# Altium PCB OmniCore_SDR.PcbDoc (part 5 of 14)
Units mil, origin at the board's own origin, x right, y up, seen from the top; angles counter-clockwise.
Board outline 4724.72 x 2755.91 mil, 8 copper layers (Top, GND 1, Layer 1, Layer 2, GND 2, Layer 3, Power, Bottom), stack 40.468 mil thick; 534 components, 427 nets, 2325 pads, 1892 vias.
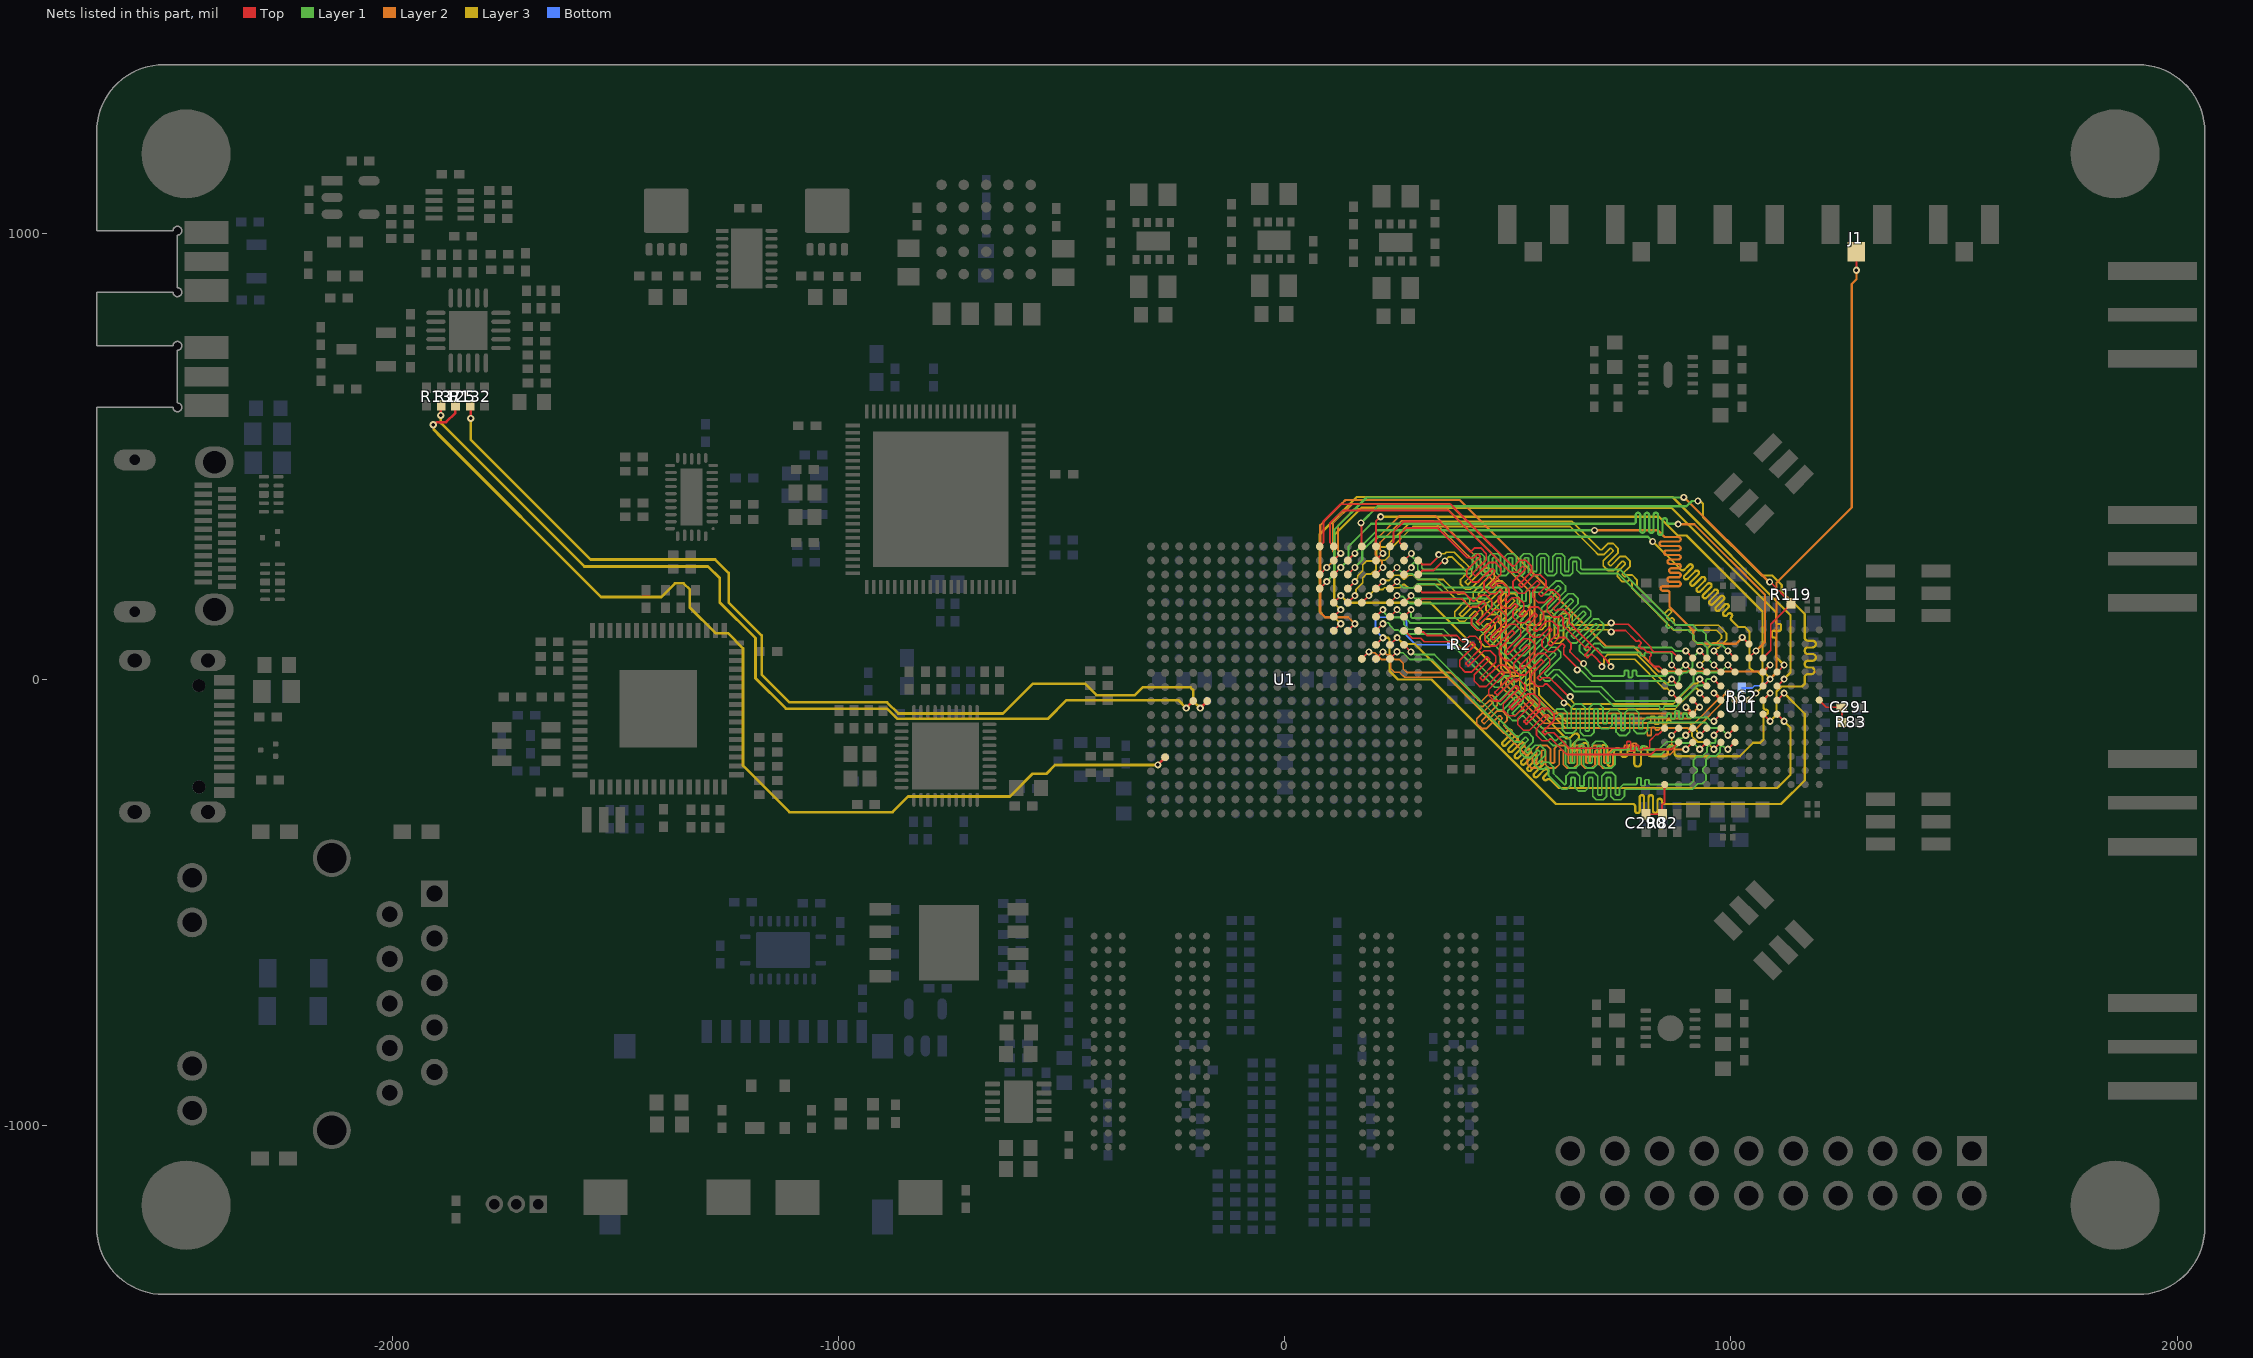
[diagram p10: the nets of this part, all layers, seen from the top]

## Via types
v1: diameter 16, hole 8, Top to Bottom, tented both sides, 1844 vias
v2: diameter 19.68, hole 7.87, Top to Bottom, 44 vias
v3: diameter 200, hole 125, Top to Bottom, 4 vias

## Nets (pads, with @x,y where several pads share a name; then routed paths per layer and width w, separated by ;. In a path a pad name is that pad's centre, name@x,y a point inside that pad or via, vN(x,y) a via of type N, cw(c..) or ccw(c..) an arc to the next point about the centre after c; other vN are vias at no path point) (continued)
AD9361_CTRL_OUT5: U1.T20 U11.F5 | length 1626.3
  Top w4.2: v1(171,351) 172.49,349.51 172.49,298.92 U1.T20@172.98,298.43 ; U11.F5@1071.98,-77.54 v1(1087.73,-93.28)
  Layer 1 w5: v1(171,351) 208.3,388.3 900.7,388.3 912.6,400.2 v1(925.9,400.2)
  Layer 3 w5: v1(925.9,400.2) 928,398.1 933.83,398.1 937.7,394.22 937.7,364.3 1068.9,233.1 1080.59,233.1 1080.69,233.2 1092.71,233.2 1114.1,211.81 1114.1,198 1165.22,146.88 1165.22,97.2 1165.22,94.7 ccw(c1172.72,94.7) 1172.72,87.2 1182.72,87.2 cw(c1182.72,79.7) 1182.72,72.2 1172.72,72.2 ccw(c1172.72,64.7) 1172.72,57.2 1182.72,57.2 cw(c1182.72,49.7) 1182.72,42.2 1172.72,42.2 ccw(c1172.72,34.7) 1172.72,27.2 1180.09,27.2 cw(c1180.09,19.7) 1180.09,12.2 1172.72,12.2 ccw(c1172.72,4.7) 1165.22,4.7 1165.22,-9.98 1159.52,-15.68 1113.33,-15.68 1102.23,-26.78 1102.23,-78.78 v1(1087.73,-93.28)
AD9361_CTRL_OUT6: U1.V13 U11.F4 | length 1625.5
  Top w4.2: U1.V13@235.98,77.95 v1(252,94) ; U11.F4@1103.48,-77.54 v1(1119.23,-93.28)
  Layer 3 w5: v1(252,94) 266.5,79.5 291.5,79.5 487.3,-116.3 489.07,-118.07 ccw(c492.6,-114.53) 496.14,-118.07 500.5,-113.7 cw(c504.04,-117.24) 507.58,-113.7 cw(c504.04,-117.24) 507.58,-120.77 488.57,-139.78 ccw(c492.11,-143.31) 488.57,-146.85 ccw(c492.11,-143.31) 495.65,-146.85 514.65,-127.85 cw(c518.18,-131.38) 521.72,-127.85 cw(c518.18,-131.38) 521.72,-134.92 502.72,-153.92 ccw(c506.25,-157.45) 502.72,-160.99 ccw(c506.25,-157.45) 509.79,-160.99 528.79,-141.99 cw(c532.32,-145.52) 535.86,-141.99 cw(c532.32,-145.52) 535.86,-149.06 516.86,-168.06 ccw(c520.39,-171.59) 516.86,-175.13 ccw(c520.39,-171.59) 523.93,-175.13 542.93,-156.13 cw(c546.47,-159.66) 550,-156.13 cw(c546.47,-159.66) 550,-163.2 531,-182.2 ccw(c534.54,-185.74) 531,-189.27 ccw(c534.54,-185.74) 538.07,-189.27 557.07,-170.27 cw(c560.61,-173.81) 564.14,-170.27 cw(c560.61,-173.81) 564.14,-177.34 545.14,-196.34 ccw(c548.68,-199.88) 545.14,-203.41 ccw(c548.68,-199.88) 552.21,-203.41 571.21,-184.41 cw(c574.75,-187.95) 578.29,-184.41 cw(c574.75,-187.95) 578.29,-191.48 559.28,-210.49 ccw(c562.82,-214.02) 559.28,-217.56 ccw(c562.82,-214.02) 566.36,-217.56 581.91,-202 cw(c585.44,-205.54) 588.98,-202 cw(c585.44,-205.54) 588.98,-209.08 580.99,-217.06 ccw(c584.53,-220.6) 580.99,-224.13 ccw(c584.53,-220.6) 588.06,-224.13 cw(c591.6,-227.67) 595.13,-224.13 612.43,-241.43 614.2,-243.2 1104,-243.2 1133.73,-213.47 1133.73,-107.78 v1(1119.23,-93.28)
AD9361_CTRL_OUT7: R2.2 U1.U13 U11.G4 | length 1882.2
  Top w4.2: U1.U13@204.48,77.95 v1(220.23,93.7) ; U11.G4@1103.48,-46.04 v1(1119.23,-30.29)
  Layer 3 w5: v1(220.23,93.7) 220.31,93.62 232.07,93.62 235,90.69 235,19 254,0 329,0 608,-279 768,-279 780.5,-279 cw(c780.5,-284) 785.5,-284 785.5,-294 ccw(c790.5,-294) 795.5,-294 795.5,-264 cw(c800.5,-264) 805.5,-264 805.5,-294 ccw(c810.5,-294) 815.5,-294 815.5,-264 cw(c820.5,-264) 825.5,-264 825.5,-294 ccw(c830.5,-294) 835.5,-294 835.5,-272.06 cw(c840.5,-272.06) 845.5,-272.06 845.5,-274 ccw(c850.5,-274) 850.5,-279 883.7,-279 1112.4,-279 1165.22,-226.18 1165.22,-76.29 v1(1119.23,-30.29)
  Bottom w4.2: v1(220.23,93.7) 203.9,110.03 203.9,133.2 210.4,139.7 265.6,139.7 272.7,132.6 272.7,99 293.7,78 R2.2@375.31,78
AD9361_DATA_CLK_N: U1.P20 U11.H11 | length 1285.1
  Top w4: U1.P20@109.99,298.43 109.99,298.63 101.24,307.38 101.24,350.24 130,379 366.54,379 433.27,312.27 496.52,249.02 504.94,240.61 519.85,240.61 532.65,253.41 534.56,253.41 539.02,248.96 539.02,247.05 511.37,219.4 511.37,205.89 524.02,193.24 537.53,193.24 565.18,220.88 567.09,220.88 571.54,216.43 571.54,214.52 555.94,198.92 555.94,185.41 568.6,172.76 582.1,172.76 595.91,186.57 597.82,186.57 602.28,182.11 602.28,180.2 588.47,166.39 588.47,152.89 601.12,140.23 614.63,140.23 617.43,143.03 619.34,143.03 623.79,138.57 623.79,136.66 623.79,121.75 642.77,102.77 671.94,73.61 673.35,72.19 676.67,72.19 678.3,73.82 680.21,73.82 684.66,69.37 684.66,67.46 673.31,56.11 673.31,54.2 677.77,49.75 679.68,49.75 686.08,56.15 689.39,56.15 695.77,49.77 708.7,36.84 708.7,31.3 v1(711,29) ; v1(867.26,1.2) U11.H11@883.01,-14.54
  Layer 3 w4: v1(711,29) 711,32.25 715.5,36.75 715.5,47.56 724.29,56.34 789.01,56.34 854.4,-9.04 857.71,-9.04 867.26,0.5 v1(867.26,1.2)
AD9361_DATA_CLK_P: U1.N20 U11.G11 | length 1284.1
  Top w4: U1.N20@78.5,298.43 78.5,298.63 87.24,307.38 87.24,356.04 124.2,393 372.34,393 443.17,322.17 506.42,258.92 510.74,254.61 514.05,254.61 526.85,267.41 540.36,267.41 553.02,254.75 553.02,241.25 525.37,213.6 525.37,211.69 529.82,207.24 531.73,207.24 559.38,234.88 572.89,234.88 585.54,222.23 585.54,208.72 569.94,193.12 569.94,191.21 574.4,186.76 576.31,186.76 590.11,200.57 603.62,200.57 616.28,187.91 616.28,174.4 602.47,160.59 602.47,158.69 606.92,154.23 608.83,154.23 611.63,157.03 625.14,157.03 637.79,144.37 637.79,130.87 637.79,127.55 652.67,112.67 723.05,42.3 723.05,40.2 731,32.25 v1(731,29) ; v1(867.26,-30.29) U11.G11@883.01,-46.04
  Layer 3 w4: v1(731,29) 731,32.25 726.5,36.75 726.5,43 728.84,45.34 784.46,45.34 849.84,-20.04 857.71,-20.04 867.26,-29.59 v1(867.26,-30.29)
AD9361_EN_AGC: U1.P16 U11.G5 | length 1626.8
  Top w4.2: U1.P16@109.99,172.44 v1(125.74,188.19) ; U11.G5@1071.98,-46.04 v1(1087.73,-30.29)
  Layer 3 w5: v1(125.74,188.19) 141.93,172 327,172 606.1,-107.1 607.87,-108.87 629.08,-130.08 ccw(c634.38,-124.78) 639.69,-130.08 646.76,-123.01 cw(c652.06,-128.31) 657.37,-123.01 cw(c652.06,-128.31) 657.37,-133.62 644.16,-146.82 ccw(c649.46,-152.13) 644.16,-157.43 ccw(c649.46,-152.13) 654.76,-157.43 667.97,-144.22 cw(c673.28,-149.53) 678.58,-144.22 cw(c673.28,-149.53) 678.58,-154.83 674.61,-158.8 ccw(c679.92,-164.1) 679.92,-171.6 698.3,-171.6 700.8,-171.6 ccw(c700.8,-164.1) 708.3,-164.1 708.3,-154.1 cw(c715.8,-154.1) 723.3,-154.1 723.3,-187.5 ccw(c730.8,-187.5) 738.3,-187.5 738.3,-161 cw(c745.8,-161) 753.3,-161 753.3,-166 ccw(c760.8,-166) 768.3,-166 768.3,-154.1 cw(c775.8,-154.1) 783.3,-154.1 783.3,-187.5 ccw(c790.8,-187.5) 798.3,-187.5 798.3,-157 cw(c805.8,-157) 813.3,-157 813.3,-164.1 ccw(c820.8,-164.1) 820.8,-171.6 850.8,-171.6 ccw(c850.8,-164.1) 858.3,-164.1 858.3,-154.1 cw(c865.8,-154.1) 873.3,-154.1 873.3,-164.1 ccw(c880.8,-164.1) 880.8,-171.6 901.7,-171.6 1020,-171.6 1049.82,-141.78 1066.46,-141.78 1073.23,-135 1073.23,-82.5 cw(c1078.23,-82.5) 1078.23,-77.5 ccw(c1078.23,-72.5) 1078.23,-67.5 cw(c1078.23,-62.5) 1073.23,-62.5 1073.23,-44.79 1083.09,-34.94 v1(1087.73,-30.29)
AD9361_ENABLE: U1.R18 U11.G6 | length 1625.5
  Top w4.2: U1.R18@141.49,235.43 v1(157.24,251.18) ; U11.G6@1040.49,-46.04 v1(1056.24,-30.29)
  Layer 1 w5: v1(157.24,251.18) 174,267.94 174,288.45 205.55,320 813.98,320 v1(824.48,309.5)
  Layer 3 w5: v1(824.48,309.5) 825,309.5 886.4,248.1 888.17,246.33 ccw(c891.7,249.87) 895.24,246.33 905.85,256.94 cw(c909.38,253.4) 912.92,256.94 cw(c909.38,253.4) 912.92,249.87 896.02,232.97 ccw(c899.56,229.44) 896.02,225.9 ccw(c899.56,229.44) 903.1,225.9 919.99,242.8 cw(c923.52,239.26) 927.06,242.8 cw(c923.52,239.26) 927.06,235.73 910.17,218.83 ccw(c913.7,215.3) 910.17,211.76 ccw(c913.7,215.3) 917.24,211.76 934.13,228.65 cw(c937.67,225.12) 941.2,228.65 cw(c937.67,225.12) 941.2,221.58 924.31,204.69 ccw(c927.84,201.15) 924.31,197.62 ccw(c927.84,201.15) 931.38,197.62 948.27,214.51 cw(c951.81,210.98) 955.34,214.51 cw(c951.81,210.98) 955.34,207.44 938.45,190.55 ccw(c941.99,187.01) 938.45,183.48 ccw(c941.99,187.01) 945.52,183.48 962.41,200.37 cw(c965.95,196.83) 969.49,200.37 cw(c965.95,196.83) 969.49,193.3 952.59,176.41 ccw(c956.13,172.87) 952.59,169.34 ccw(c956.13,172.87) 959.66,169.34 976.56,186.23 cw(c980.09,182.69) 983.63,186.23 cw(c980.09,182.69) 983.63,179.16 966.73,162.26 ccw(c970.27,158.73) 966.73,155.19 ccw(c970.27,158.73) 973.81,155.19 986.66,168.05 cw(c990.2,164.51) 993.73,168.05 cw(c990.2,164.51) 993.73,160.98 983.63,150.87 ccw(c987.16,147.34) 983.63,143.8 ccw(c987.16,147.34) 990.7,143.8 994.23,147.34 cw(c997.77,143.8) 1001.31,147.34 cw(c997.77,143.8) 1001.31,140.27 ccw(c1004.84,136.73) 1001.31,133.19 1011.58,122.92 1013.35,121.15 1016.4,118.1 1031.1,118.1 1041.74,107.46 1041.74,26.69 1050.42,18.01 1059.94,18.01 1070.74,7.21 1070.74,-15.79 v1(1056.24,-30.29)
AD9361_FB_CLK_N: U1.P19 U11.G10 | length 1320.6
  Top w4: U11.G10@914.5,-46.04 914.5,-46.27 930,-61.77 v1(930,-62)
  Top w4.2: U1.P19@109.99,266.93 v1(125.74,282.68)
  Layer 2 w4: v1(125.74,282.68) 125.74,284.52 119.24,291.02 119.24,345.24 157,383 364.44,383 549.1,198.34 549.1,-39.1 559,-49 566.78,-56.78 566.78,-60.09 562.11,-64.76 562.11,-66.67 566.56,-71.13 568.47,-71.13 575.97,-63.63 577.88,-63.63 582.33,-68.09 582.33,-70 576.31,-76.02 576.31,-77.93 580.76,-82.38 582.67,-82.38 585.87,-79.18 589.18,-79.18 597,-87 909.36,-87 920,-76.36 920,-68.49 922.34,-66.14 922.61,-66.14 926.75,-62 v1(930,-62)
AD9361_FB_CLK_P: U1.N18 U11.F10 | length 1320.5
  Top w4: v1(899,-62) U11.F10@914.5,-77.54
  Top w4.2: U1.N18@78.5,235.43 v1(94.24,251.18)
  Layer 2 w4: v1(94.24,251.18) 109.81,266.75 109.81,284.9 108.24,286.46 108.24,349.8 152.44,394 369,394 560.1,202.9 560.1,193.79 560.1,-34.54 566.78,-41.22 601.56,-76 904.8,-76 909,-71.8 909,-68.49 906.66,-66.14 906.39,-66.14 902.25,-62 v1(899,-62)
AD9361_RESET: R119.1 U1.N17 U11.K5 | length 1446.6
  Top w4.2: U1.N17@78.5,203.94 v1(94.24,219.68) ; U11.K5@1071.98,48.45 1089.31,65.77 1089.31,123.66 1134.4,168.75 1134.4,172.68 1088.38,218.7 v1(1086.7,218.7)
  Layer 1 w5: v1(94.24,219.68) 111,236.44 111,336 183.3,408.3 v1(894.2,408.3)
  Layer 2 w5: v1(894.2,408.3) 895.65,408.3 1085.25,218.7 v1(1086.7,218.7)
AD9361_RX_D0_N: U1.Y19 U11.K11 | length 1266.4
  Top w4: U1.Y19@298.97,266.93 299.17,266.93 307.92,258.18 327.42,258.18 341.22,271.98 ; 740.34,124 769.54,124 821.64,71.9 821.64,67.92 827.04,62.52 868.94,62.52 U11.K11@883.01,48.45
  Layer 3 w4: v1(345,280) 347.11,282.11 359,282.11 362.41,285.52 380.04,285.52 383.26,282.3 398.28,267.28 401.97,263.59 419.33,246.22 419.33,233.8 405.29,219.75 405.29,217.84 409.74,213.39 411.65,213.39 447.61,249.35 458.64,249.35 469.53,238.45 469.53,227.43 433.57,191.47 433.57,189.56 438.03,185.1 439.94,185.1 475.9,221.06 486.92,221.06 497.82,210.16 497.82,199.14 461.86,163.18 461.86,161.27 466.31,156.82 468.22,156.82 504.18,192.78 515.2,192.78 526.1,181.88 526.1,170.86 490.14,134.9 490.14,132.99 494.6,128.53 496.51,128.53 532.47,164.49 543.49,164.49 554.39,153.6 554.39,142.57 540.34,128.53 540.34,125.21 542.59,122.97 543.06,122.5 549.5,122.5 566,122.5 571.22,122.5 573.57,124.84 573.57,144.71 581.36,152.5 596.77,152.5 604.57,144.71 604.57,93.85 605.92,92.5 612.22,92.5 613.57,93.85 613.57,140.6 621.36,148.39 636.77,148.39 644.57,140.6 644.57,124.84 646.91,122.5 662.95,122.5 724.25,122.5 728.75,127 v1(732,127)
AD9361_RX_D0_P: U1.Y18 U11.J12 | length 1266.7
  Top w4: U1.Y18@298.97,235.43 299.17,235.43 307.92,244.18 333.22,244.18 351.12,262.08 ; 740.34,110 763.74,110 786.37,87.37 787.78,85.95 791.1,85.95 792.48,87.34 794.39,87.34 798.84,82.88 798.84,80.97 794.15,76.28 794.15,74.37 798.6,69.91 800.51,69.91 803.83,69.91 807.37,66.37 811.74,62 816.25,62 821.07,57.18 821.07,53.87 818,50.8 818,39.2 827.96,29.24 839.23,29.24 U11.J12@851.51,16.95
  Layer 3 w4: v1(359.14,265.86) 359.14,266.69 366.97,274.52 375.48,274.52 390.5,259.5 394.19,255.81 408.33,241.66 408.33,238.35 394.29,224.31 394.29,213.28 405.19,202.39 416.21,202.39 452.17,238.35 454.08,238.35 458.53,233.89 458.53,231.98 422.57,196.02 422.57,185 433.47,174.1 444.49,174.1 480.45,210.06 482.36,210.06 486.82,205.61 486.82,203.7 450.86,167.74 450.86,156.72 461.76,145.82 472.78,145.82 508.74,181.78 510.65,181.78 515.1,177.32 515.1,175.41 479.14,139.45 479.14,128.43 490.04,117.53 501.06,117.53 537.02,153.49 538.93,153.49 543.39,149.04 543.39,147.13 529.34,133.08 529.34,120.66 534.81,115.19 538.5,111.5 566,111.5 575.78,111.5 584.57,120.29 584.57,140.15 585.92,141.5 592.22,141.5 593.57,140.15 593.57,89.29 601.36,81.5 616.77,81.5 624.57,89.29 624.57,136.04 625.92,137.39 632.22,137.39 633.57,136.04 633.57,120.29 642.35,111.5 662.95,111.5 724.25,111.5 728.75,107 v1(732,107)
AD9361_RX_D1_N: U1.V18 U11.K10 | length 1328.2
  Top w4: U1.V18@235.98,235.43 v1(251.72,251.18) ; v1(898.76,64.2) U11.K10@914.5,48.45
  Layer 1 w4: v1(251.72,251.18) 265.96,236.94 285.76,236.94 297.7,225 341.06,225 359.48,206.58 474,206.58 523.25,206.58 532.03,197.79 532.03,177.1 533.38,175.75 539.68,175.75 541.03,177.1 541.03,197.79 549.82,206.58 559.6,206.58 580.72,206.58 581.68,205.62 585.37,201.93 588.68,201.93 607.4,220.65 618.42,220.65 629.32,209.75 629.32,198.73 586.29,155.7 586.29,153.79 590.74,149.34 592.65,149.34 635.69,192.37 646.71,192.37 657.61,181.47 657.61,170.45 614.57,127.42 614.57,125.51 619.03,121.05 620.94,121.05 663.97,164.08 674.99,164.08 685.89,153.19 685.89,142.16 642.86,99.13 642.86,97.22 647.31,92.77 649.22,92.77 692.25,135.8 703.28,135.8 714.17,124.9 714.17,113.88 671.59,71.29 671.59,69.38 676.04,64.93 677.95,64.93 693.95,80.92 706.38,80.92 714.36,72.94 715.3,72 720.8,72 867.23,72 875.04,64.2 v1(898.76,64.2)
AD9361_RX_D1_P: U1.V17 U11.J11 | length 1328.2
  Top w4: U1.V17@235.98,203.94 v1(251.72,219.68) ; v1(867.26,32.7) U11.J11@883.01,16.95
  Layer 1 w4: v1(251.72,219.68) 265.72,205.68 289.02,205.68 297.33,214 336.5,214 354.92,195.58 474,195.58 518.69,195.58 521.03,193.24 521.03,172.54 528.83,164.75 544.24,164.75 552.03,172.54 552.03,193.24 554.38,195.58 559.6,195.58 571.63,195.58 576.17,195.58 577.59,194.15 580.81,190.93 593.24,190.93 611.96,209.65 613.87,209.65 618.32,205.2 618.32,203.29 575.29,160.26 575.29,149.23 586.19,138.34 597.21,138.34 640.24,181.37 642.15,181.37 646.61,176.91 646.61,175 603.57,131.97 603.57,120.95 614.47,110.05 625.49,110.05 668.53,153.08 670.44,153.08 674.89,148.63 674.89,146.72 631.86,103.69 631.86,92.67 642.76,81.77 653.78,81.77 696.81,124.8 698.72,124.8 703.17,120.34 703.17,118.44 660.59,75.85 660.59,64.83 671.49,53.93 682.51,53.93 698.51,69.92 701.82,69.92 706.58,65.16 710.27,61.47 710.74,61 784.3,61 795.3,61 797.64,58.66 797.64,54.83 798.99,53.48 805.29,53.48 806.64,54.83 806.64,58.66 808.99,61 831,61 862.68,61 867.26,56.42 v1(867.26,32.7)
AD9361_RX_D2_N: U1.W20 U11.K9 | length 1329.9
  Top w4: U1.W20@267.47,298.43 266.14,298.43 257.85,306.72 257.85,325.2 272.65,340 341.96,340 350.98,330.98 400.31,281.65 408.72,273.24 423.63,273.24 431.46,281.06 433.37,281.06 437.82,276.61 437.82,274.7 408.08,244.96 408.08,231.45 420.74,218.79 434.25,218.79 463.99,248.53 465.9,248.53 470.35,244.08 470.35,242.17 446.59,218.41 446.59,204.9 459.25,192.25 472.76,192.25 482.44,201.93 484.35,201.93 488.8,197.48 488.8,195.57 479.12,185.89 479.12,172.38 491.78,159.72 505.28,159.72 515.18,169.62 517.09,169.62 521.55,165.17 521.55,163.26 511.65,153.36 511.65,139.85 524.3,127.2 537.81,127.2 559.54,148.92 561.45,148.92 565.9,144.47 565.9,142.56 544.17,120.83 544.17,107.32 556.83,94.67 570.34,94.67 592.28,116.62 594.19,116.62 598.65,112.16 598.65,110.25 576.7,88.3 576.7,74.8 589.36,62.14 602.86,62.14 621.04,80.32 622.95,80.32 627.4,75.86 627.4,73.95 625.16,71.71 625.16,56.8 634.48,47.48 652.08,29.88 652.08,28.76 655.8,25.04 v1(655.8,21.79) ; v1(930.25,64.2) U11.K9@946,48.45
  Layer 1 w4: v1(655.8,21.79) 658.03,19.56 664.52,19.56 687.16,-3.08 851.75,-3.08 861.46,-12.8 873.06,-12.8 884.76,-1.1 884.76,7 892.96,15.2 901.06,15.2 913.7,27.84 913.7,47.64 v1(930.25,64.2)
AD9361_RX_D2_P: U1.V20 U11.J10 | length 1329.9
  Top w4: U1.V20@235.98,298.43 235.98,299.75 243.85,307.63 243.85,331 266.85,354 347.76,354 360.88,340.88 410.21,291.55 414.52,287.24 417.84,287.24 425.66,295.06 439.17,295.06 451.82,282.41 451.82,268.9 422.08,239.16 422.08,237.25 426.54,232.79 428.45,232.79 458.19,262.53 471.7,262.53 484.35,249.88 484.35,236.37 460.59,212.61 460.59,210.7 465.05,206.25 466.96,206.25 476.64,215.93 490.15,215.93 502.8,203.27 502.8,189.77 493.12,180.09 493.12,178.18 497.57,173.72 499.48,173.72 509.38,183.62 522.89,183.62 535.55,170.97 535.55,157.46 525.65,147.56 525.65,145.65 530.1,141.2 532.01,141.2 553.74,162.92 567.25,162.92 579.9,150.27 579.9,136.76 558.17,115.03 558.17,113.12 562.63,108.67 564.54,108.67 586.48,130.62 599.99,130.62 612.65,117.96 612.65,104.45 590.7,82.51 590.7,80.6 595.15,76.14 597.06,76.14 615.24,94.32 628.74,94.32 641.4,81.66 641.4,68.15 639.16,65.91 639.16,62.6 644.38,57.38 661.98,39.78 662.97,39.78 666.75,36 v1(669.87,36) ; v1(898.76,32.7) U11.J10@914.5,16.95
  Layer 1 w4: v1(669.87,36) 672.17,33.7 672.17,27.47 691.72,7.92 757,7.92 759,7.92 761.34,10.26 761.34,19.19 762.69,20.54 768.99,20.54 770.34,19.19 770.34,6.27 771.69,4.92 777.99,4.92 779.34,6.27 779.34,18.8 780.69,20.15 786.99,20.15 788.34,18.8 788.34,10.26 790.69,7.92 818,7.92 853.26,7.92 860.55,15.2 873.06,15.2 874.54,13.73 877.85,13.73 890.33,26.2 890.41,26.2 896.91,32.7 v1(898.76,32.7)
AD9361_RX_D3_N: U1.R17 U11.K8 | length 1283.4
  Top w4: U1.R17@141.49,203.94 v1(157.24,219.68) ; v1(961.75,64.2) U11.K8@977.5,48.45
  Layer 3 w4: v1(157.24,219.68) 157.24,221.53 163.73,228.03 163.73,232.73 174.73,243.73 174.73,256.98 183.75,266 197,266 205.82,274.82 205.82,288.06 214.63,296.88 225.82,296.88 282.94,354 644.56,354 703.78,294.78 707.47,291.09 710.78,291.09 724.83,305.13 735.85,305.13 746.75,294.23 746.75,283.21 725.01,261.47 725.01,259.56 729.47,255.11 731.38,255.11 752.24,275.97 763.26,275.97 774.16,265.07 774.16,254.05 757.05,236.95 757.05,235.04 761.51,230.58 763.42,230.58 767.35,234.52 778.37,234.52 789.27,223.62 789.27,212.6 789.27,209.28 803.78,194.78 807.47,191.08 847.78,150.78 849.19,149.36 852.51,149.36 860.5,157.36 862.41,157.36 866.87,152.9 866.87,150.99 856.05,140.18 856.05,138.27 860.5,133.81 862.41,133.81 866.83,138.23 868.74,138.23 873.19,133.77 873.19,131.87 871.6,130.27 871.6,126.96 875.36,123.19 876.78,121.78 972.22,121.78 986.78,107.22 990,104 990,88.59 972.1,70.69 970.09,70.69 963.6,64.2 v1(961.75,64.2)
AD9361_RX_D3_P: U1.R16 U11.J9 | length 1283.4
  Top w4: U1.R16@141.49,172.44 v1(157.28,188.23) ; v1(930.25,32.7) U11.J9@946,16.95
  Layer 3 w4: v1(157.28,188.23) 159.53,190.48 159.53,201.73 174.73,216.93 174.73,228.18 183.34,236.78 194.13,236.78 204.78,247.43 204.78,258.22 214.11,267.55 224.9,267.55 234.23,276.88 234.23,289.73 287.5,343 640,343 696,287 699.69,283.31 702.91,280.09 715.34,280.09 729.39,294.13 731.3,294.13 735.75,289.68 735.75,287.77 714.01,266.03 714.01,255.01 724.91,244.11 735.93,244.11 756.79,264.97 758.7,264.97 763.16,260.51 763.16,258.6 746.05,241.5 746.05,230.48 756.95,219.58 767.97,219.58 771.91,223.52 773.82,223.52 778.27,219.06 778.27,217.15 778.27,204.73 796,187 799.69,183.31 872.22,110.78 967.67,110.78 979,99.44 979,93.15 967.55,81.69 959.45,81.69 946.81,69.06 946.81,49.26 v1(930.25,32.7)
AD9361_RX_D4_N: U1.W19 U11.K7 | length 1329
  Top w4: U1.W19@267.47,266.93 267.95,266.93 283.52,282.5 v1(284,282.5) ; v1(993.24,64.2) U11.K7@1008.99,48.45
  Layer 1 w4: v1(284,282.5) 286.3,280.2 286.3,274.19 289.24,271.25 296.28,271.25 307,260.53 307,250.2 310.2,247 413.74,247 418.37,247 420.72,249.34 420.72,275.38 427.34,282 441.09,282 447.72,275.38 447.72,243.35 449.07,242 455.37,242 456.72,243.35 456.72,275.38 463.34,282 477.09,282 483.72,275.38 483.72,243.35 485.07,242 491.37,242 492.72,243.35 492.72,275.38 499.34,282 513.09,282 519.72,275.38 519.72,243.19 521.07,241.84 527.37,241.84 528.72,243.19 528.72,275.38 535.34,282 549.09,282 555.72,275.38 555.72,243.34 557.07,241.99 563.37,241.99 564.72,243.34 564.72,275.38 571.34,282 585.09,282 591.72,275.38 591.72,243.35 593.07,242 599.37,242 600.72,243.35 600.72,275.38 607.34,282 621.09,282 627.72,275.38 627.72,243.35 629.07,242 635.37,242 636.72,243.35 636.72,267.19 643.34,273.81 657.09,273.81 663.72,267.19 663.72,249.34 666.06,247 748.58,247 750.44,247 874.99,122.46 914.45,122.46 927.21,109.69 936.05,109.69 944.25,101.49 944.25,89.47 955.53,78.2 979.24,78.2 v1(993.24,64.2)
AD9361_RX_D4_P: U1.W18 U11.J8 | length 1329
  Top w4: U1.W18@267.47,235.43 267.95,235.43 283.52,251 v1(284,251) ; v1(961.75,32.7) U11.J8@977.5,16.95
  Layer 1 w4: v1(284,251) 286.3,253.3 286.3,259.31 289.24,262.25 292.55,262.25 298,256.8 298,246.47 306.47,238 413.74,238 422.1,238 429.72,245.62 429.72,271.65 431.07,273 437.37,273 438.72,271.65 438.72,239.62 445.34,233 459.09,233 465.72,239.62 465.72,271.65 467.07,273 473.37,273 474.72,271.65 474.72,239.62 481.34,233 495.09,233 501.72,239.62 501.72,271.65 503.07,273 509.37,273 510.72,271.65 510.72,239.46 517.34,232.84 531.09,232.84 537.72,239.46 537.72,271.65 539.07,273 545.37,273 546.72,271.65 546.72,239.61 553.34,232.99 567.09,232.99 573.72,239.61 573.72,271.65 575.07,273 581.37,273 582.72,271.65 582.72,239.62 589.34,233 603.09,233 609.72,239.62 609.72,271.65 611.07,273 617.37,273 618.72,271.65 618.72,239.62 625.34,233 639.09,233 645.72,239.62 645.72,263.46 647.07,264.81 653.37,264.81 654.72,263.46 654.72,245.62 662.33,238 746.72,238 748.58,236.14 849.48,135.24 857.25,127.46 857.25,124.15 854.73,121.62 854.73,119.71 859.18,115.26 861.09,115.26 863.62,117.78 866.93,117.78 871.26,113.46 871.47,113.46 873.47,111.46 903.53,111.46 916.25,98.73 916.25,89.89 924.45,81.69 936.47,81.69 942.68,75.48 947.75,70.42 947.75,46.7 v1(961.75,32.7)
AD9361_RX_D5_N: U1.W16 U11.J7 | length 1326.5
  Top w4: U1.W16@267.47,172.44 v1(283.22,188.19) ; v1(993.24,32.7) U11.J7@1008.99,16.95
  Layer 1 w4: v1(283.22,188.19) 285.07,188.19 291.56,181.69 456.06,181.69 490.88,146.88 494.57,143.19 497.89,143.19 511.93,157.23 522.95,157.23 533.85,146.33 533.85,135.31 497.89,99.35 497.89,97.44 502.34,92.99 504.25,92.99 540.21,128.95 551.24,128.95 562.13,118.05 562.13,107.03 526.17,71.07 526.17,69.16 530.63,64.7 532.54,64.7 568.5,100.66 579.52,100.66 590.42,89.77 590.42,78.74 554.46,42.78 554.46,40.87 558.91,36.42 560.82,36.42 596.78,72.38 607.8,72.38 618.7,61.48 618.7,50.46 582.74,14.5 582.74,12.59 587.2,8.13 589.11,8.13 603.15,22.18 615.58,22.18 632.1,5.65 635.8,1.96 653.76,-16 709,-16 741,-48 874.44,-48 916.25,-6.19 916.25,7 924.45,15.2 936.05,15.2 938.85,12.41 951.41,12.41 955.14,16.14 976.69,16.14 v1(993.24,32.7)
AD9361_RX_D5_P: U1.V16 U11.H8 | length 1326.2
  Top w4: U1.V16@235.98,172.44 v1(251.72,188.19) ; v1(961.75,1.2) U11.H8@977.5,-14.54
  Layer 1 w4: v1(251.72,188.19) 254.02,185.89 265.27,185.89 280.47,170.69 451.51,170.69 483.1,139.1 486.79,135.41 490.02,132.19 502.44,132.19 516.49,146.23 518.4,146.23 522.85,141.78 522.85,139.87 486.89,103.91 486.89,92.89 497.79,81.99 508.81,81.99 544.77,117.95 546.68,117.95 551.13,113.49 551.13,111.58 515.17,75.62 515.17,64.6 526.07,53.7 537.09,53.7 573.05,89.66 574.96,89.66 579.42,85.21 579.42,83.3 543.46,47.34 543.46,36.32 554.36,25.42 565.38,25.42 601.34,61.38 603.25,61.38 607.7,56.93 607.7,55.02 571.74,19.05 571.74,8.03 582.64,-2.87 593.66,-2.87 607.71,11.18 611.02,11.18 624.33,-2.12 628.02,-5.82 649.2,-27 704.44,-27 736.44,-59 827,-59 838,-59 840.34,-61.34 840.34,-65.72 841.69,-67.07 847.99,-67.07 849.34,-65.72 849.34,-61.34 851.69,-59 866,-59 879,-59 924.55,-13.45 935.4,-13.45 944.25,-4.59 944.25,-1.06 946.72,1.41 960.15,1.41 v1@961.05,0.51
AD9361_RX_FRAME_N: U1.U19 U11.G7 | length 1320.6
  Top w4: U1.U19@204.48,266.93 v1(220.23,282.68) ; v1(993.24,-30.29) U11.G7@1008.99,-46.04
  Layer 2 w4: v1(220.23,282.68) 220.23,284.52 213.73,291.02 213.73,307.18 262.56,356 332.44,356 485,203.44 485,34.52 485,24.74 493.79,15.96 515.46,15.96 516.81,14.61 516.81,8.31 515.46,6.96 493.79,6.96 485,-1.83 485,-15.77 485,-16.43 577.56,-109 585.17,-109 706,-109 799,-109 810,-109 812.34,-111.34 812.34,-124.19 813.69,-125.54 819.99,-125.54 821.34,-124.19 821.34,-108.83 822.69,-107.48 828.99,-107.48 830.34,-108.83 830.34,-111.34 831.69,-112.69 837.99,-112.69 839.34,-111.34 841.69,-109 862,-109 923.06,-109 983,-49.06 983,-44.45 983.05,-44.4 983.05,-39.9 983,-39.84 983,-36.53 985.34,-34.19 986.1,-34.19 990,-30.29 v1(993.24,-30.29)
AD9361_RX_FRAME_P: U1.U18 U11.G8 | length 1320.6
  Top w4: U1.U18@204.48,235.43 v1(220.23,251.18) ; v1(961.75,-30.29) U11.G8@977.5,-46.04
  Layer 2 w4: v1(220.23,251.18) 217.93,253.48 217.93,264.72 202.73,279.92 202.73,311.73 258,367 337,367 496,208 496,34.52 496,29.3 498.34,26.96 520.01,26.96 527.81,19.16 527.81,3.75 520.01,-4.04 498.34,-4.04 496,-6.39 496,-11.88 499.89,-15.77 582.12,-98 585.17,-98 706,-98 918.5,-98 972,-44.51 972,-36.53 969.65,-34.19 968.89,-34.19 965,-30.29 v1(961.75,-30.29)
AD9361_RXLO_EXT: C291.2 R83.1 U11.G1 | length 91.4
  Top w4.2: U11.G1@1197.97,-46.04 1213.93,-62 C291.2@1248.31,-62 1249.31,-63 R83.1@1249.31,-96
AD9361_SPI_CLK: U1.R14 U11.J5 | length 1524.6
  Top w4.2: U1.R14@141.49,109.45 v1(157.24,125.2) ; U11.J5@1071.98,16.95 v1(1087.73,32.7)
  Layer 2 w5: v1(157.24,125.2) 142.74,139.7 90.3,139.7 83,147 83,147.43 79.74,150.69 79.74,345.74 129,395 136.5,402.5 392.5,402.5 720.9,74.1 782.39,74.1 838.29,18.2 1073.23,18.2 v1(1087.73,32.7)
AD9361_SPI_DI: U1.P15 U11.J4 | length 1488.1
  Top w4.2: U1.P15@109.99,140.94 v1(125.74,156.69) ; U11.J4@1103.48,16.95 v1(1119.23,32.7)
  Layer 3 w5: v1(125.74,156.69) 111.24,171.19 111.24,324.24 172,385 866.8,385 1101,150.8 1101,129.96 1101,127.45 1103.93,124.53 1110.31,124.53 1112.56,122.28 1112.56,111.78 1110.31,109.53 1094.25,109.53 1092,107.28 1092,96.78 1094.25,94.53 1098.07,94.53 1101,91.6 1101,86.5 1101,62 1101,50.93 v1(1119.23,32.7)
AD9361_SPI_DO: U1.R19 U11.L6 | length 1524.5
  Top w4.2: U1.R19@141.49,266.93 v1(157.24,282.68) ; v1(1025.5,94.46) 1025.74,94.46 1040.25,79.94 U11.L6@1040.49,79.94
  Layer 1 w5: v1(157.24,282.68) 157.24,284.41 207.22,334.4 694.2,334.4 v1(694.3,334.5)
  Layer 2 w5: v1(694.3,334.5) 694.4,334.4 836.5,334.4 846.6,324.3 849.1,321.8 ; 849.13,321.77 ccw(c855.14,327.84) 855.14,319.3 882.48,319.3 cw(c882.48,314.3) 882.48,309.3 844.9,309.3 ccw(c844.9,304.3) 844.9,299.3 882.48,299.3 cw(c882.48,294.3) 882.48,289.3 855.41,289.3 ccw(c855.41,284.3) 855.41,279.3 882.48,279.3 cw(c882.48,274.3) 882.48,269.3 862.9,269.3 ccw(c862.9,264.3) 862.9,259.3 882.48,259.3 cw(c882.48,254.3) 882.48,249.3 866.5,249.3 ccw(c866.5,244.3) 866.5,239.3 882.48,239.3 cw(c882.48,234.3) 882.48,229.3 862.81,229.3 ccw(c862.81,224.3) 862.81,219.3 882.48,219.3 cw(c882.48,214.3) 882.48,209.3 847.42,209.3 ccw(c847.42,204.3) 847.42,199.3 857.48,199.3 cw(c857.48,194.3) 862.48,194.3 862.48,167.2 862.48,163.12 915.42,110.18 915.42,90.02 924.94,80.5 1004.2,80.5 1012.24,80.5 1014.87,83.14 ; 1014.9,83.14 1025.5,93.74 v1(1025.5,94.46)
AD9361_SPI_ENB: U1.P18 U11.K6 | length 1524.5
  Top w4.2: U1.P18@109.99,235.43 v1(125.74,251.18) ; U11.K6@1040.49,48.45 v1(1056.24,64.2)
  Layer 1 w5: v1(125.74,251.18) 142.74,268.18 142.74,297.74 194,349 779.3,349 781.8,349 ccw(c781.8,354) 786.8,354 786.8,369 cw(c791.8,369) 796.8,369 796.8,334 ccw(c801.8,334) 806.8,334 806.8,369 cw(c811.8,369) 816.8,369 816.8,333.7 ccw(c821.8,333.7) 826.8,333.7 826.8,369 cw(c831.8,369) 836.8,369 836.8,329 ccw(c841.8,329) 846.8,329 846.8,356.65 cw(c851.8,356.65) 856.8,356.65 856.8,354 ccw(c861.8,354) 861.8,349 869.7,349 881,349 v1(881.7,348.3)
  Layer 2 w5: v1(881.7,348.3) 918,348.3 1076.3,190 1076.3,84.26 v1(1056.24,64.2)
AD9361_SYNC: J1.1 R62.1 U1.U20 U11.H5 | length 2304.9
  Top w4.2: U1.U20@204.48,298.43 204.48,354.48 v1(215,365) ; U11.H5@1071.98,-14.54 v1(1087.73,1.2) ; v1(1281.18,917.39) J1.1@1281.18,958.9
  Top w5: J1.1@1281.18,958.9 J1.1@1281.26,958.98
  Layer 2 w5: v1(1087.73,1.2) 1102.23,15.7 1102.23,216.83 1270.9,385.5 1270.9,886.55 1281.18,896.83 v1(1281.18,917.39)
  Layer 3 w5: v1(215,365) 838.8,365 880.95,322.85 900.65,322.85 1070.74,152.76 1070.74,19.94 1087.73,2.94 v1(1087.73,1.2)
  Bottom w4.2: R62.1@1024.5,-18.86 1047.73,-18.86 1052.89,-13.7 1072.4,-13.7 1087.3,1.2 v1(1087.73,1.2)
AD9361_TX_D0_N: U1.Y14 U11.E12 | length 1345.6
  Top w4: U1.Y14@298.97,109.45 301.59,106.82 308.16,106.82 310.92,106.81 318.73,99 385,99 394.5,89.5 398.81,85.19 402.13,85.19 414.22,97.28 427.73,97.28 440.39,84.62 440.39,71.12 406.38,37.11 406.38,35.2 410.83,30.74 412.74,30.74 446.75,64.75 460.26,64.75 472.91,52.1 472.91,38.59 438.9,4.58 438.9,2.67 443.36,-1.78 445.27,-1.78 479.28,32.23 492.78,32.23 505.44,19.57 505.44,6.06 471.43,-27.95 471.43,-29.85 475.88,-34.31 477.79,-34.31 512.32,0.21 525.82,0.21 538.48,-12.44 538.48,-25.95 503.96,-60.47 503.96,-62.38 508.41,-66.84 510.32,-66.84 545.04,-32.12 558.54,-32.12 571.2,-44.77 571.2,-58.28 536.48,-93 536.48,-94.91 540.94,-99.36 542.85,-99.36 577.56,-64.64 591.07,-64.64 603.73,-77.3 603.73,-90.81 578.06,-116.47 578.06,-118.38 582.52,-122.84 584.43,-122.84 588.18,-119.09 603.09,-119.09 636.36,-152.36 637.71,-153.71 762,-153.71 764,-153.71 766.34,-151.37 766.34,-140.06 767.69,-138.71 773.99,-138.71 775.34,-140.06 775.34,-158.36 776.69,-159.71 782.99,-159.71 784.34,-158.36 784.34,-148.41 785.69,-147.06 791.99,-147.06 793.34,-148.41 793.34,-156.05 794.69,-157.4 800.99,-157.4 802.34,-156.05 804.69,-153.71 810,-153.71 815.66,-153.71 818,-151.37 818,-137.2 832.2,-123 834.1,-123 837.35,-123 841.48,-118.87 841.67,-118.87 U11.E12@851.51,-109.03
AD9361_TX_D0_P: U1.W14 U11.D11 | length 1345.3
  Top w4: U1.W14@267.47,109.45 268.89,109.45 285.53,92.81 305.12,92.81 312.93,85 379.2,85 384.6,79.6 393.02,71.19 407.93,71.19 420.02,83.28 421.93,83.28 426.39,78.83 426.39,76.92 392.38,42.91 392.38,29.4 405.03,16.74 418.54,16.74 452.55,50.75 454.46,50.75 458.91,46.3 458.91,44.39 424.9,10.38 424.9,-3.13 435.07,-13.3 437.56,-15.78 451.06,-15.78 485.07,18.23 486.98,18.23 491.44,13.77 491.44,11.86 457.43,-22.15 457.43,-35.65 470.08,-48.31 483.59,-48.31 518.12,-13.79 520.02,-13.79 524.48,-18.24 524.48,-20.15 489.96,-54.67 489.96,-68.18 502.61,-80.84 516.12,-80.84 550.84,-46.12 552.75,-46.12 557.2,-50.57 557.2,-52.48 522.48,-87.2 522.48,-100.71 535.14,-113.36 548.65,-113.36 583.36,-78.64 585.27,-78.64 589.73,-83.1 589.73,-85.01 564.06,-110.67 564.06,-124.18 576.72,-136.84 590.23,-136.84 593.97,-133.09 597.29,-133.09 626.46,-162.26 631.91,-167.71 762,-167.71 821.46,-167.71 832.16,-157 866.54,-157 867.26,-156.28 U11.D11@883.01,-140.53
AD9361_TX_D1_N: U1.U12 U11.E11 | length 1319.8
  Top w4: U1.U12@204.48,46.46 v1(220.23,62.2) ; v1(867.13,-125.13) 867.13,-125.02 883.01,-109.14 U11.E11@883.01,-109.03
  Layer 2 w4: v1(220.23,62.2) 222.08,62.2 228.57,55.71 236.17,55.71 247.17,44.71 257.52,44.71 265.72,36.51 265.72,23.76 273.49,16 372,16 433.5,-45.5 437.19,-49.19 440.51,-49.19 454.55,-35.15 465.57,-35.15 476.47,-46.05 476.47,-57.07 441.51,-92.03 441.51,-93.94 445.97,-98.39 447.88,-98.39 476.17,-70.09 487.2,-70.09 498.09,-80.99 498.09,-92.01 490.71,-99.4 490.71,-102.71 496.24,-108.24 499.93,-111.93 520,-132 545,-157 546.65,-157 555.43,-165.79 555.43,-185.65 556.78,-187 563.08,-187 564.43,-185.65 564.43,-155.29 572.23,-147.5 587.64,-147.5 595.43,-155.29 595.43,-185.65 596.78,-187 603.08,-187 604.43,-185.65 604.43,-155.29 612.23,-147.5 627.64,-147.5 635.43,-155.29 635.43,-185.65 636.78,-187 643.08,-187 644.43,-185.65 644.43,-155.29 652.23,-147.5 667.64,-147.5 675.43,-155.29 675.43,-185.65 676.78,-187 683.08,-187 684.43,-185.65 684.43,-155.29 692.23,-147.5 707.64,-147.5 715.43,-155.29 715.43,-185.65 716.78,-187 723.08,-187 724.43,-185.65 724.43,-165.79 733.22,-157 743,-157 756.86,-157 758.86,-157 761.21,-154.66 761.21,-148.94 762.56,-147.59 768.86,-147.59 770.21,-148.94 770.21,-158.65 771.56,-160 777.86,-160 779.21,-158.65 779.21,-144.22 780.56,-142.87 786.86,-142.87 788.21,-144.22 788.21,-154.66 790.55,-157 823,-157 858.87,-157 867.25,-148.62 867.25,-125.24 v1(867.13,-125.13)
AD9361_TX_D1_P: U1.T12 U11.D10 | length 1319.8
  Top w4: U1.T12@172.98,46.46 v1(188.73,62.2) ; v1(898.76,-156.28) U11.D10@914.5,-140.53
  Layer 2 w4: v1(188.73,62.2) 191.03,59.91 202.28,59.91 217.48,44.71 231.61,44.71 237.72,38.6 237.72,24.91 246.08,16.56 257.37,16.56 268.93,5 367.44,5 425.72,-53.28 429.41,-56.97 432.64,-60.19 445.06,-60.19 459.11,-46.15 461.02,-46.15 465.47,-50.6 465.47,-52.51 430.51,-87.47 430.51,-98.49 441.41,-109.39 452.43,-109.39 480.73,-81.09 482.64,-81.09 487.09,-85.55 487.09,-87.46 479.71,-94.84 479.71,-107.27 488.46,-116.01 492.15,-119.71 520,-147.56 540.44,-168 542.09,-168 544.43,-170.34 544.43,-190.21 552.23,-198 567.64,-198 575.43,-190.21 575.43,-159.85 576.78,-158.5 583.08,-158.5 584.43,-159.85 584.43,-190.21 592.23,-198 607.64,-198 615.43,-190.21 615.43,-159.85 616.78,-158.5 623.08,-158.5 624.43,-159.85 624.43,-190.21 632.23,-198 647.64,-198 655.43,-190.21 655.43,-159.85 656.78,-158.5 663.08,-158.5 664.43,-159.85 664.43,-190.21 672.23,-198 687.64,-198 695.43,-190.21 695.43,-159.85 696.78,-158.5 703.08,-158.5 704.43,-159.85 704.43,-190.21 712.23,-198 727.64,-198 735.43,-190.21 735.43,-170.34 737.78,-168 743,-168 756.86,-168 863.42,-168 875.03,-156.39 898.64,-156.39 v1(898.76,-156.28)
AD9361_TX_D2_N: U1.U15 U11.E10 | length 1328.9
  Top w4: U1.U15@204.48,140.94 v1(220.23,156.69) ; v1(898.76,-124.78) U11.E10@914.5,-109.03
  Layer 1 w4: v1(220.23,156.69) 220.23,153.45 224.34,149.33 224.34,149.01 238.39,134.97 241.7,134.97 245.93,139.2 257.52,139.2 267.38,129.34 267.38,122.86 277.24,113 356,113 441,28 471.5,-2.5 475.19,-6.19 478.51,-6.19 492.55,7.85 503.57,7.85 510.31,1.11 514.47,-3.05 514.47,-14.07 478.51,-50.03 478.51,-51.94 482.97,-56.39 484.87,-56.39 512.47,-28.8 523.49,-28.8 534.39,-39.7 534.39,-50.72 510.7,-74.41 510.7,-76.31 515.16,-80.77 517.07,-80.77 527.2,-70.63 539.63,-70.63 574.31,-105.31 578,-109 594,-125 605.42,-136.42 608.73,-136.42 617.23,-127.92 632.64,-127.92 640.43,-135.72 640.43,-185.65 641.78,-187 648.08,-187 649.43,-185.65 649.43,-141.79 657.23,-134 672.64,-134 680.43,-141.79 680.43,-185.65 681.78,-187 688.08,-187 689.43,-185.65 689.43,-145.79 697.23,-138 712.64,-138 720.43,-145.79 720.43,-185.65 721.78,-187 728.08,-187 729.43,-185.65 729.43,-165.79 738.22,-157 748,-157 754,-157 778.31,-157 780.66,-154.66 782.01,-153.31 788.31,-153.31 789.66,-154.66 789.66,-157.92 791.01,-159.27 797.31,-159.27 798.66,-157.92 798.66,-150.35 800.01,-149 806.31,-149 807.66,-150.35 807.66,-154.66 810,-157 821,-157 837.8,-157 855.67,-139.13 873.87,-139.13 881.72,-131.28 890.41,-131.28 896.91,-124.78 v1(898.76,-124.78)
AD9361_TX_D2_P: U1.U14 U11.D9 | length 1328.2
  Top w4: U1.U14@204.48,109.45 v1(220.23,125.2) ; v1(930.25,-156.28) U11.D9@946,-140.53
  Layer 1 w4: v1(220.23,125.2) 222.39,127.36 231.89,127.36 235.27,123.97 235.27,121.85 245.93,111.2 254.6,111.2 263.8,102 351.44,102 429.33,24.11 463.72,-10.28 467.41,-13.97 470.64,-17.19 483.06,-17.19 497.11,-3.15 499.02,-3.15 503.47,-7.6 503.47,-9.51 467.51,-45.47 467.51,-56.49 478.41,-67.39 489.43,-67.39 517.02,-39.8 518.93,-39.8 523.39,-44.26 523.39,-46.16 499.7,-69.85 499.7,-80.87 510.6,-91.77 521.62,-91.77 531.76,-81.63 535.07,-81.63 566.53,-113.09 570.22,-116.78 573.44,-120 591,-137.56 600.86,-147.42 613.29,-147.42 621.78,-138.92 628.08,-138.92 629.43,-140.27 629.43,-190.21 637.23,-198 652.64,-198 660.43,-190.21 660.43,-146.35 661.78,-145 668.08,-145 669.43,-146.35 669.43,-190.21 677.23,-198 692.64,-198 700.43,-190.21 700.43,-150.35 701.78,-149 708.08,-149 709.43,-150.35 709.43,-190.21 717.23,-198 732.64,-198 740.43,-190.21 740.43,-170.34 742.78,-168 748,-168 842.36,-168 860.23,-150.13 878.42,-150.13 886.27,-142.28 916.25,-142.28 v1(930.25,-156.28)
AD9361_TX_D3_N: U1.U17 U11.E9 | length 1283.4
  Top w4: U1.U17@204.48,203.94 v1(220.23,219.68) ; v1(930.25,-124.78) U11.E9@946,-109.03
  Layer 3 w4: v1(220.23,219.68) 222.52,221.98 234.22,221.98 245.93,233.68 257.52,233.68 265.82,225.39 269.13,225.39 277.42,233.68 289.02,233.68 298.7,224 355.95,224 384.97,194.97 388.66,191.28 391.98,191.28 392.98,192.28 404,192.28 414.9,181.38 414.9,170.36 391.98,147.44 391.98,145.53 396.44,141.08 398.35,141.08 421.26,163.99 432.28,163.99 443.18,153.1 443.18,142.07 430.19,129.08 430.19,127.17 434.64,122.71 436.55,122.71 449.55,135.71 460.57,135.71 471.47,124.81 471.47,113.79 448.55,90.88 448.55,88.97 453.01,84.51 454.92,84.51 478.25,107.85 489.27,107.85 500.17,96.95 500.17,85.93 493.89,79.65 493.89,71.03 493.89,63.64 493.89,42.03 512.96,22.96 516.65,19.27 519.96,19.27 531.78,31.08 542.8,31.08 553.7,20.18 553.7,9.16 537.95,-6.59 537.95,-8.5 542.4,-12.95 544.31,-12.95 548.25,-9.02 559.27,-9.02 570.17,-19.92 570.17,-30.94 570.17,-34.25 570.27,-34.35 573.96,-38.04 632.92,-97 816,-97 818,-97 820.34,-94.66 820.34,-83.35 821.69,-82 827.99,-82 829.34,-83.35 829.34,-98.65 830.69,-100 836.99,-100 838.34,-98.65 838.34,-83.35 839.69,-82 845.99,-82 847.34,-83.35 847.34,-98.65 848.69,-100 854.99,-100 856.34,-98.65 856.34,-92.23 857.69,-90.88 863.99,-90.88 865.34,-92.23 865.34,-94.66 867.69,-97 876,-97 906.33,-97 923.76,-114.42 923.76,-116.44 930.25,-122.93 v1(930.25,-124.78)
AD9361_TX_D3_P: U1.T16 U11.D8 | length 1283.4
  Top w4: U1.T16@172.98,172.44 v1(188.73,188.19) ; v1(961.75,-156.28) U11.D8@977.5,-140.53
  Layer 3 w4: v1(188.73,188.19) 202.73,202.19 220.19,202.19 223.68,205.68 257.52,205.68 264.79,212.95 269.27,212.95 276.54,205.68 289.02,205.68 296.33,213 351.39,213 377.19,187.19 380.89,183.5 384.11,180.28 396.54,180.28 397.53,181.28 399.44,181.28 403.9,176.82 403.9,174.91 380.98,152 380.98,140.98 391.88,130.08 402.9,130.08 425.82,152.99 427.73,152.99 432.18,148.54 432.18,146.63 419.19,133.63 419.19,122.61 430.08,111.71 441.11,111.71 454.1,124.71 456.01,124.71 460.47,120.26 460.47,118.35 437.55,95.43 437.55,84.41 448.45,73.51 459.47,73.51 482.81,96.85 484.72,96.85 489.17,92.39 489.17,90.48 482.89,84.2 482.89,71.03 482.89,52.64 482.89,37.47 505.18,15.18 508.87,11.49 512.09,8.27 524.52,8.27 536.34,20.08 538.25,20.08 542.7,15.63 542.7,13.72 526.95,-2.03 526.95,-13.06 537.85,-23.95 548.87,-23.95 552.81,-20.02 554.71,-20.02 559.17,-24.47 559.17,-26.38 559.17,-38.81 562.49,-42.13 566.18,-45.82 628.36,-108 901.78,-108 912.76,-118.98 912.76,-127.08 925.39,-139.72 945.19,-139.72 v1(961.75,-156.28)
AD9361_TX_D4_N: U1.W13 U11.E8 | length 1328.9
  Top w4: U1.W13@267.47,77.95 267.47,77.67 282.94,62.19 v1(282.94,61.91) ; v1(961.75,-124.78) U11.E8@977.5,-109.03
  Layer 1 w4: v1(282.94,61.91) 285.38,61.91 291.29,56 335.81,56 435.97,-44.15 439.86,-48.04 516.85,-125.04 520.55,-128.73 523.86,-128.73 534.37,-118.22 545.39,-118.22 556.29,-129.12 556.29,-140.14 538.96,-157.47 538.96,-159.38 543.41,-163.84 545.32,-163.84 561.8,-147.37 572.82,-147.37 583.72,-158.26 583.72,-169.29 570.13,-182.87 570.13,-184.78 574.58,-189.24 576.49,-189.24 580.43,-185.3 591.45,-185.3 602.35,-196.2 602.35,-207.22 602.35,-210.54 611.61,-219.8 615.31,-223.49 622.92,-231.11 626.81,-235 628.15,-235 630.49,-232.66 630.49,-216.18 638.28,-208.39 653.7,-208.39 661.49,-216.18 661.49,-237.26 662.84,-238.61 669.14,-238.61 670.49,-237.26 670.49,-216.18 678.28,-208.39 693.7,-208.39 701.49,-216.18 701.49,-257.04 702.84,-258.39 709.14,-258.39 710.49,-257.04 710.49,-216.18 718.28,-208.39 733.7,-208.39 741.49,-216.18 741.49,-257.04 742.84,-258.39 749.14,-258.39 750.49,-257.04 750.49,-243.79 759.28,-235 773.81,-235 785.4,-235 787.4,-235 789.75,-232.66 789.75,-221.35 791.1,-220 797.4,-220 798.75,-221.35 798.75,-236.65 800.1,-238 806.4,-238 807.75,-236.65 807.75,-225.99 809.1,-224.64 815.4,-224.64 816.75,-225.99 816.75,-232.66 819.09,-235 830.8,-235 908.73,-235 916.25,-227.48 916.25,-213.47 924.45,-205.27 924.45,-201.25 916,-192.8 916,-181.2 925.03,-172.18 936.27,-172.18 946.11,-162.34 946.11,-152.11 955.95,-142.28 963.35,-142.28 965.69,-139.93 965.69,-131.97 961.75,-128.03 v1(961.75,-124.78)
AD9361_TX_D4_P: U1.V12 U11.D7 | length 1328.3
  Top w4: U1.V12@235.98,46.46 v1(251.76,62.24) ; v1(993.24,-156.28) U11.D7@1008.99,-140.53
  Layer 1 w4: v1@251.88,62.24 v1(251.76,62.24) 254.06,59.94 265.11,59.94 280.05,45 331.26,45 509.08,-132.82 512.77,-136.51 515.99,-139.73 528.42,-139.73 538.93,-129.22 540.84,-129.22 545.29,-133.68 545.29,-135.59 527.96,-152.92 527.96,-163.94 538.86,-174.84 549.88,-174.84 566.35,-158.37 568.26,-158.37 572.72,-162.82 572.72,-164.73 559.13,-178.32 559.13,-189.34 570.03,-200.24 581.05,-200.24 584.98,-196.3 586.89,-196.3 591.35,-200.76 591.35,-202.67 591.35,-215.09 603.84,-227.58 607.53,-231.27 622.26,-246 622.92,-246 632.7,-246 641.49,-237.21 641.49,-220.74 642.84,-219.39 649.14,-219.39 650.49,-220.74 650.49,-241.82 658.28,-249.61 673.7,-249.61 681.49,-241.82 681.49,-220.74 682.84,-219.39 689.14,-219.39 690.49,-220.74 690.49,-261.6 698.28,-269.39 713.7,-269.39 721.49,-261.6 721.49,-220.74 722.84,-219.39 729.14,-219.39 730.49,-220.74 730.49,-261.6 738.28,-269.39 753.69,-269.39 761.49,-261.6 761.49,-248.34 763.83,-246 773.81,-246 913.28,-246 926.02,-233.27 936.05,-233.27 944.25,-225.07 944.25,-213.47 936.84,-206.06 936.84,-199.96 944.05,-192.75 944.05,-179.95 952.99,-171.01 966.81,-171.01 975.75,-162.07 975.75,-151.71 978.09,-149.37 983.09,-149.37 990,-156.28 v1(993.24,-156.28)
AD9361_TX_D5_N: U1.W15 U11.F8 | length 1328.8
  Top w4: U1.W15@267.47,140.94 v1(283.22,156.69) ; v1(961.75,-93.28) U11.F8@977.5,-77.54
  Layer 1 w4: v1(283.22,156.69) 283.22,140.34 285.56,138 425.56,138 540,23.56 540,-18.44 574.56,-53 584.78,-63.22 597.31,-75.75 600.62,-75.75 610.23,-66.14 625.64,-66.14 633.43,-73.94 633.43,-107.57 634.78,-108.92 641.08,-108.92 642.43,-107.57 642.43,-62.79 650.23,-55 665.64,-55 673.43,-62.79 673.43,-113.65 674.78,-115 681.08,-115 682.43,-113.65 682.43,-62.79 690.23,-55 705.64,-55 713.43,-62.79 713.43,-97.65 714.78,-99 721.08,-99 722.43,-97.65 722.43,-74.79 730.23,-67 745.64,-67 753.43,-74.79 753.43,-112.65 754.78,-114 761.08,-114 762.43,-112.65 762.43,-74.79 770.23,-67 785.64,-67 793.43,-74.79 793.43,-108.65 794.78,-110 801.08,-110 802.43,-108.65 802.43,-93.79 811.22,-85 821,-85 841,-85 854.31,-85 856.66,-82.66 856.66,-77.36 858.01,-76.01 864.31,-76.01 865.66,-77.36 865.66,-86.65 867.01,-88 873.31,-88 874.66,-86.65 874.66,-71.35 876.01,-70 882.31,-70 883.66,-71.35 883.66,-86.65 885.01,-88 891.31,-88 892.66,-86.65 892.66,-77.35 894.01,-76 900.31,-76 901.66,-77.35 901.66,-82.66 904,-85 915,-85 947.56,-85 950.78,-88.22 953.54,-90.99 959.45,-90.99 v1(961.75,-93.28)
AD9361_TX_D5_P: U1.V15 U11.E7 | length 1328.2
  Top w4: U1.V15@235.98,140.94 v1(251.72,156.69) ; v1(993.24,-124.78) U11.E7@1008.99,-109.03
  Layer 1 w4: v1(251.72,156.69) 251.72,156.31 281.03,127 421,127 529,19 529,-23 567,-61 580.22,-74.22 592.75,-86.75 605.18,-86.75 614.78,-77.14 621.08,-77.14 622.43,-78.49 622.43,-112.13 630.23,-119.92 645.64,-119.92 653.43,-112.13 653.43,-67.35 654.78,-66 661.08,-66 662.43,-67.35 662.43,-118.21 670.23,-126 685.64,-126 693.43,-118.21 693.43,-67.35 694.78,-66 701.08,-66 702.43,-67.35 702.43,-102.21 710.23,-110 725.64,-110 733.43,-102.21 733.43,-79.35 734.78,-78 741.08,-78 742.43,-79.35 742.43,-117.21 750.23,-125 765.64,-125 773.43,-117.21 773.43,-79.35 774.78,-78 781.08,-78 782.43,-79.35 782.43,-113.21 790.23,-121 805.64,-121 813.43,-113.21 813.43,-98.34 815.78,-96 821,-96 943,-96 955.43,-108.43 976.89,-108.43 v1(993.24,-124.78)
AD9361_TX_FRAME_N: U1.Y17 U11.H9 | length 1285.7
  Top w4: U1.Y17@298.97,203.94 299.17,203.94 307.92,195.19 402.57,195.19 417.38,180.38 421.69,176.06 425.01,176.06 437.81,188.87 451.32,188.87 463.97,176.21 463.97,162.7 432.39,131.12 432.39,129.21 436.84,124.76 438.75,124.76 470.34,156.34 483.84,156.34 496.5,143.68 496.5,130.18 462.17,95.85 462.17,93.94 466.63,89.49 468.54,89.49 502.86,123.81 516.37,123.81 529.03,111.16 529.03,97.65 494.7,63.32 494.7,61.41 499.15,56.96 501.06,56.96 535.39,91.29 548.9,91.29 561.55,78.63 561.55,65.12 527.22,30.8 527.22,28.89 531.68,24.43 533.59,24.43 567.92,58.76 581.42,58.76 594.08,46.1 594.08,32.6 566.76,5.28 566.76,3.37 571.21,-1.09 573.12,-1.09 578.53,4.32 593.44,4.32 613.88,-16.12 631.98,-34.22 632.97,-34.22 636.75,-38 v1(640,-38) ; v1(930.25,1.2) U11.H9@946,-14.54
  Layer 3 w4: v1(640,-38) 642.3,-40.3 642.3,-46.66 650.64,-55 870.19,-55 916.14,-9.04 924.01,-9.04 926.36,-6.7 926.36,-5.94 930.25,-2.04 v1(930.25,1.2)
AD9361_TX_FRAME_P: U1.Y16 U11.G9 | length 1283.2
  Top w4: U1.Y16@298.97,172.44 299.17,172.44 307.92,181.19 396.77,181.19 407.48,170.48 415.89,162.06 430.81,162.06 443.61,174.87 445.52,174.87 449.97,170.41 449.97,168.5 418.39,136.92 418.39,123.41 431.04,110.76 444.55,110.76 476.13,142.34 478.04,142.34 482.5,137.89 482.5,135.98 448.17,101.65 448.17,88.14 460.83,75.49 474.33,75.49 508.66,109.81 510.57,109.81 515.03,105.36 515.03,103.45 480.7,69.12 480.7,55.62 493.35,42.96 506.86,42.96 541.19,77.29 543.1,77.29 547.55,72.83 547.55,70.92 513.22,36.6 513.22,23.09 525.88,10.43 539.39,10.43 573.72,44.76 575.62,44.76 580.08,40.31 580.08,38.4 552.76,11.07 552.76,-2.43 562.93,-12.61 565.41,-15.09 578.92,-15.09 584.33,-9.68 587.64,-9.68 603.98,-26.02 622.08,-44.12 622.08,-45.12 625.86,-48.89 v1(625.86,-52.14) ; v1(930.25,-30.29) U11.G9@946,-46.04
  Layer 3 w4: v1(625.86,-52.14) 628.15,-54.44 634.52,-54.44 646.08,-66 874.74,-66 920.7,-20.04 924.01,-20.04 926.36,-22.39 926.36,-23.15 930.25,-27.04 v1(930.25,-30.29)
AD9361_TXLO_EXT: C290.2 R82.1 U11.A12 | length 106.4
  Top w4.2: C290.2@809.5,-301.86 R82.1@846.5,-301.86 845.9,-301.26 845.9,-280.4 851.51,-274.79 U11.A12@851.51,-235.02
AD9361_TXNRX: U1.P14 U11.H4 | length 1625.6
  Top w4.2: U1.P14@109.99,109.45 v1(125.74,125.2) ; U11.H4@1103.48,-14.54 v1(1119.23,1.2)
  Layer 3 w5: v1(125.74,125.2) 111.24,139.7 90.73,139.7 78,152.43 78,325.3 161.7,409 869,409 1133.73,144.27 1133.73,15.7 v1(1119.23,1.2)
ADF4001_CE: R137.1 U1.D9 | length 2116.6
  Top w6: v1(-1891.31,592) -1891.31,613.7 R137.1@-1890.35,614.66 ; v1(-220.72,-63.78) U1.D9@-204.97,-48.03
  Layer 3 w6: v1(-1891.31,592) -1891.04,591.74 -1891.04,575.04 -1569.6,253.6 -1292.39,253.6 -1265.98,227.2 -1265.98,172.98 -1186,93 -1186,3 -1118,-65 -891,-65 -868,-88 -531,-88 -489,-46 -238.5,-46 v1(-220.72,-63.78)
ADF4001_CLK: R125.1 U1.B5 | length 2337.9
  Top w4.2: v1(-284.22,-191.27) v1@-284.22,-190.77 ; U1.B5@-267.96,-174.51 U1.B5@-267.96,-174.02
  Top w6: v1(-1908,571) -1905.49,571 -1899.49,577 -1879,577 -1858.63,597.37 -1858.63,614.37 R125.1@-1858.35,614.66 ; v1@-284.22,-190.77 U1.B5@-267.96,-174.51
  Layer 3 w6: v1(-1908,571) -1906.98,569.98 -1906.98,559.98 -1888.98,541.98 -1532,185 -1397,185 -1366.32,215.68 -1347.13,215.68 -1333,201.56 -1333,161 -1276,104 -1248,104 -1214,70 -1214,-193 -1110,-297 -879,-297 -844,-262 -616,-262 -565,-211 -534,-211 -514.27,-191.27 v1(-284.22,-191.27)
ADF4001_DATA: R132.1 U1.E9 | length 2158.6
  Top w6: R132.1@-1825.35,614.66 -1824.12,613.43 v1(-1824.12,585.33) ; v1(-189.22,-63.78) U1.E9@-173.47,-48.03
  Layer 3 w6: v1(-1824.12,585.33) -1824.12,538.12 -1555.3,269.3 -1276.3,269.3 -1246,239 -1246,172.81 -1172,98.81 -1172,11 -1110,-51 -890.86,-51 -865.86,-76 -631.21,-76 -564.21,-9 -448,-9 -422,-35 -335.9,-35 -318.18,-17.28 -210.72,-17.28 -205,-23 -205,-48 v1(-189.22,-63.78)